# Altium PCB Junction_Box.PcbDoc (part 1 of 2)
Units mm, origin at the board's own origin, x right, y up, seen from the top; angles counter-clockwise.
Board outline 50.93 x 35.69 mm, 2 copper layers (Top Layer, Bottom Layer), stack 1.448 mm thick; 47 components, 35 nets, 148 pads, 173 vias.
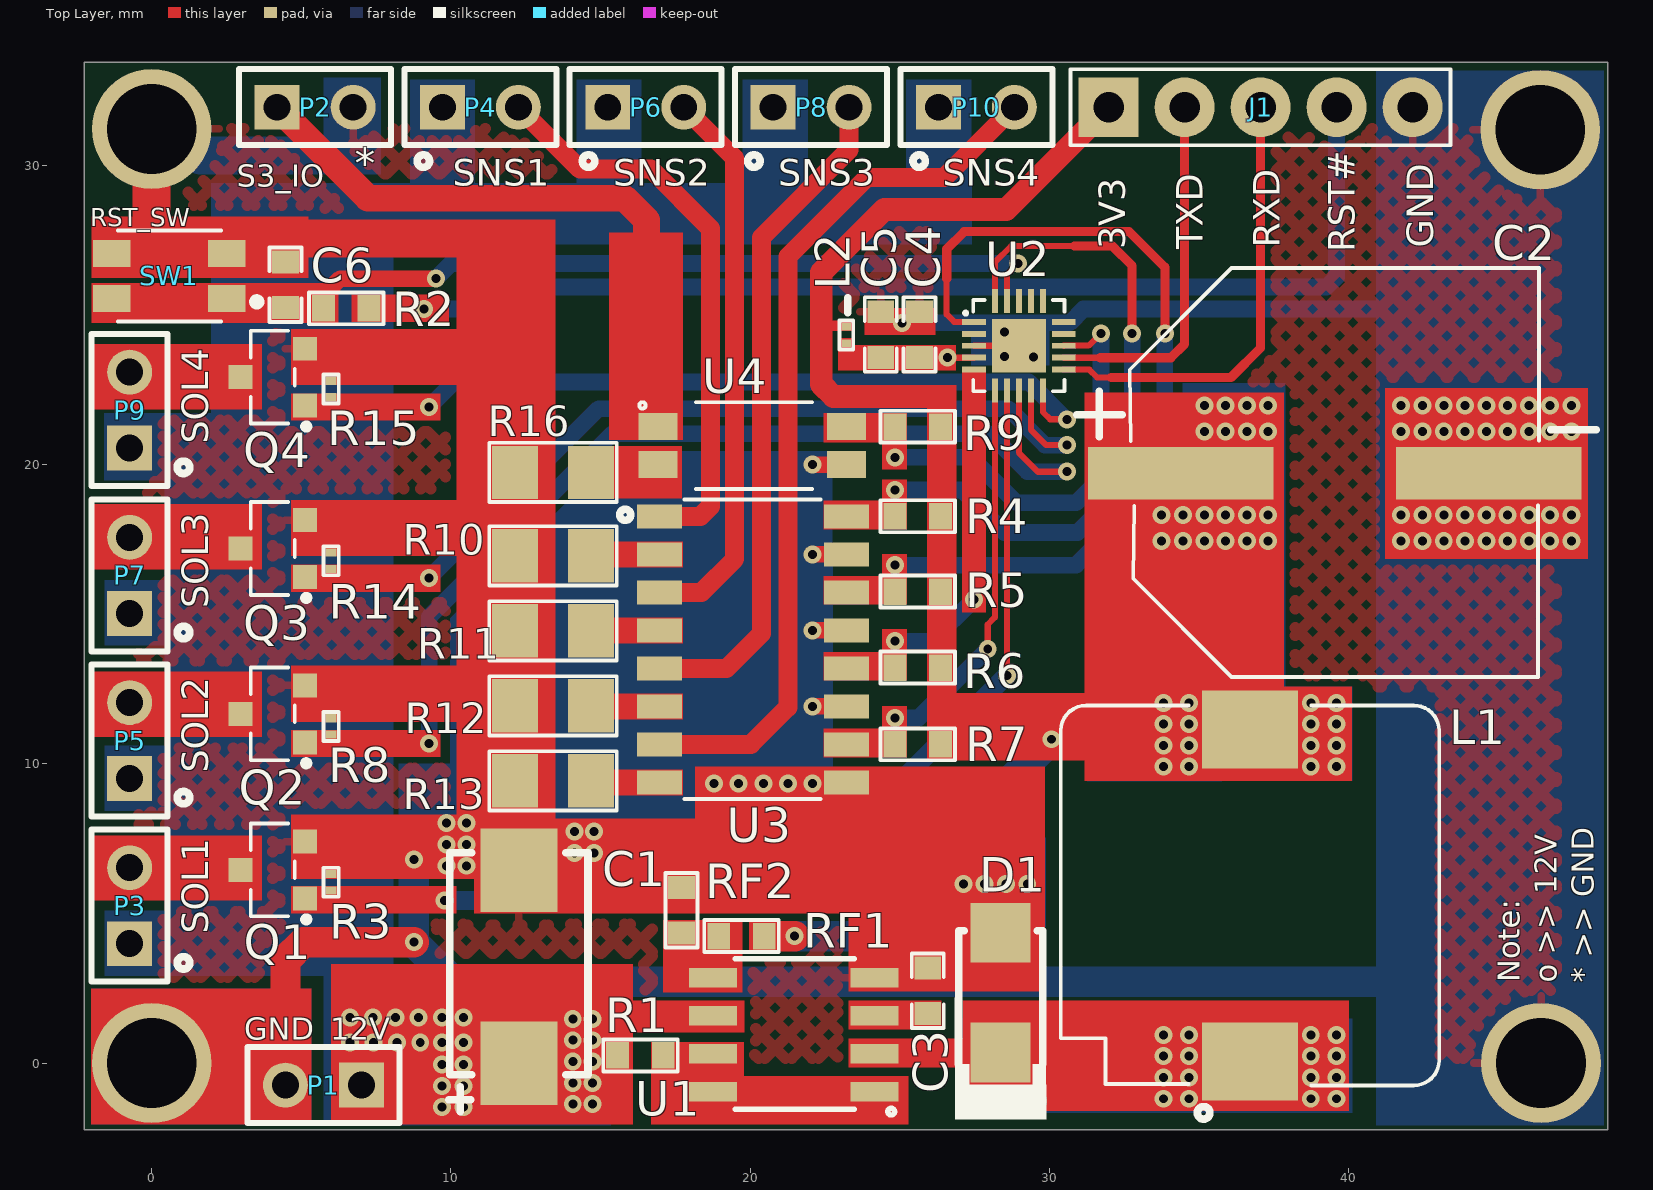
[diagram p0: Top Layer view]
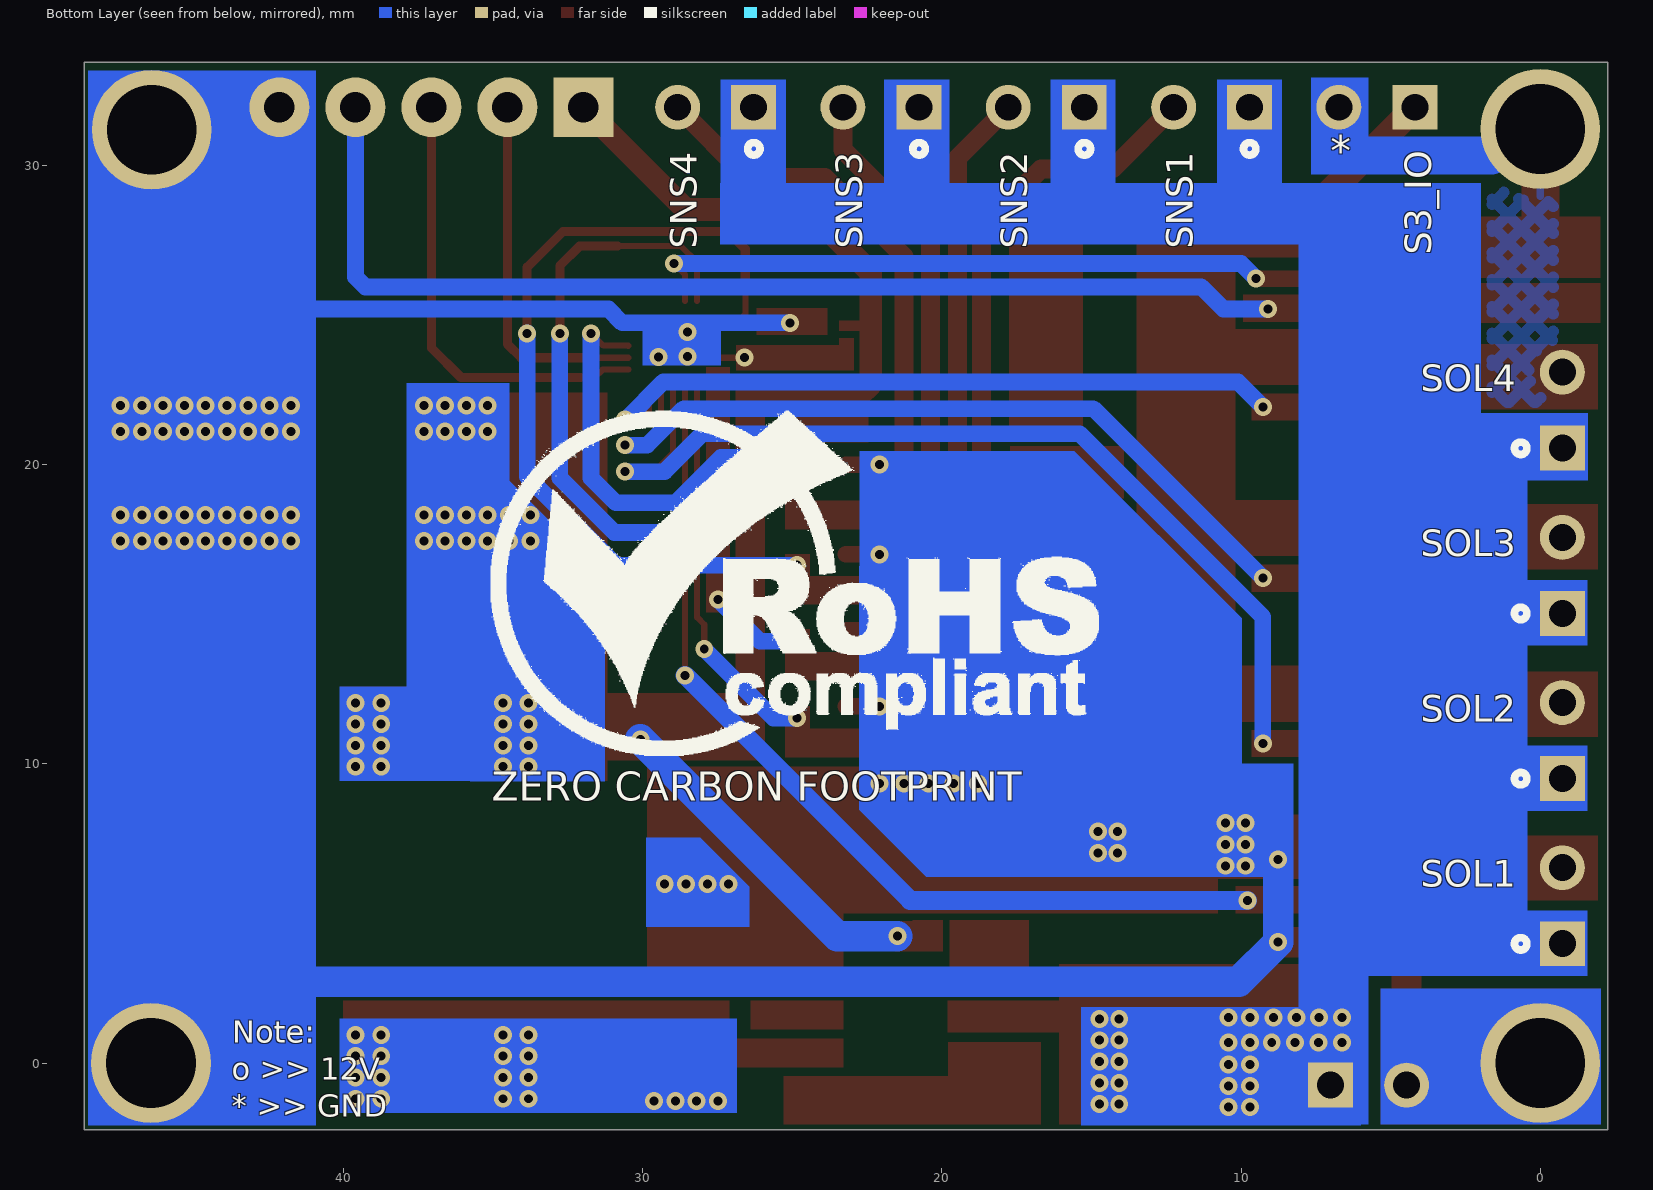
[diagram p1: Bottom Layer view, seen from below]
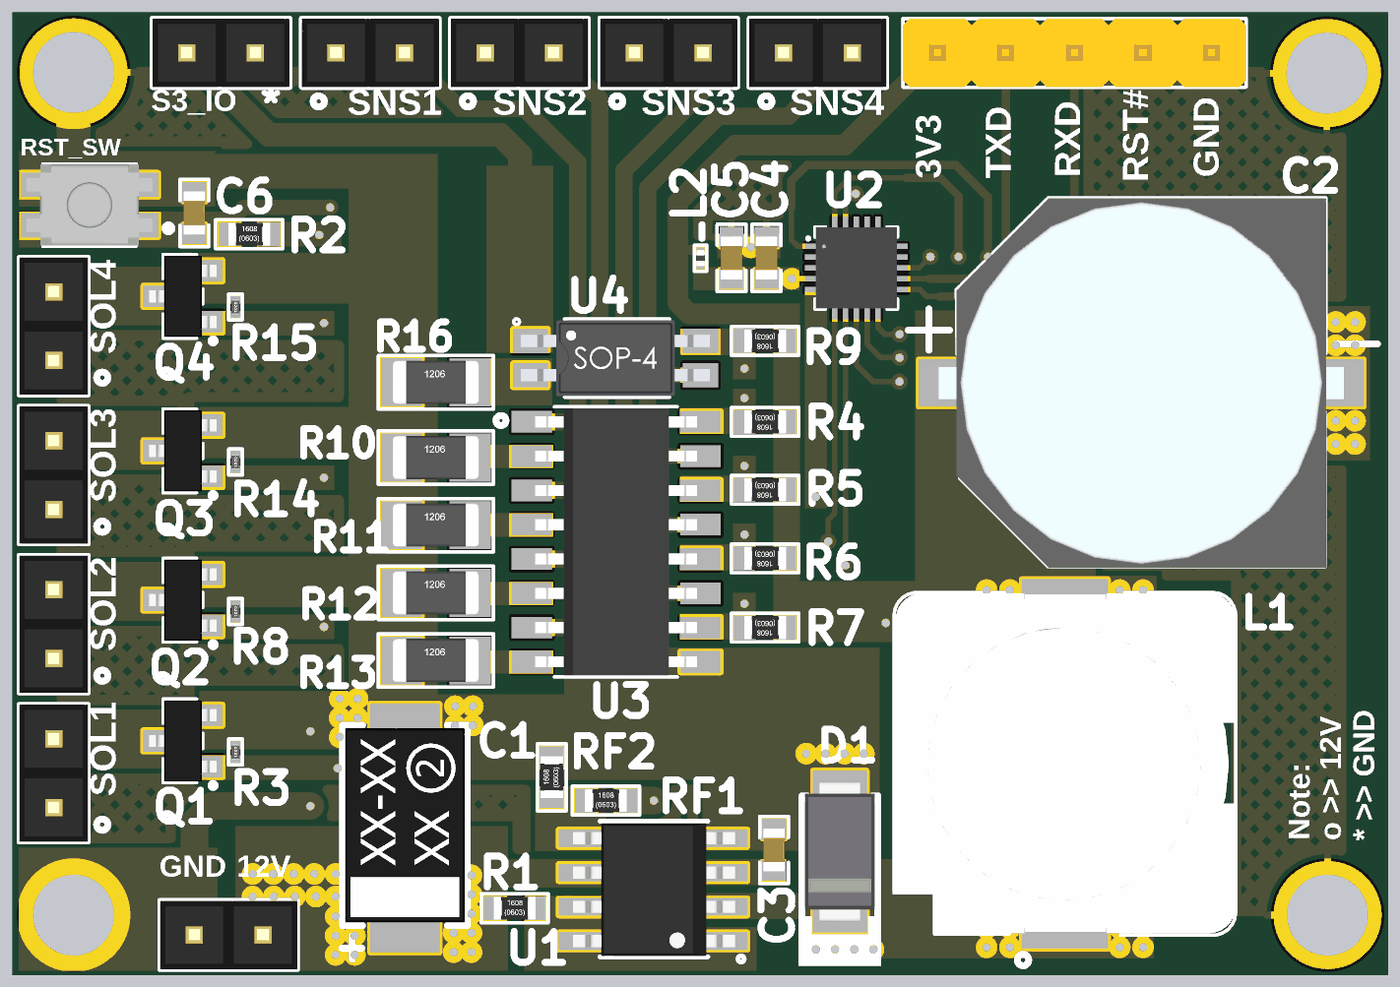
[diagram p2: 3D render of the assembled board from above, using the file's embedded part models]

## Layer stack, top to bottom
Top Solder: solder mask 0.0762, Solder Resist, Dk 3.5
Top Layer: signal copper 0.254
Dielectric 1: dielectric 0.9398, FR-4, Dk 4.8
Bottom Layer: signal copper 0.254
Bottom Solder: solder mask 0.0762, Solder Resist, Dk 3.5

## Board outline
-2.261,-2.235 48.666,-2.235 48.666,33.452 -2.261,33.452

## Design rules (kind name [scope] priority, off if disabled: settings)
Clearance [All] p1: gap=0.178 ignorepadtopadclearanceinfootprint=FALSE except(0: Arc-Hole Track-Hole SMDPad-Hole THPad-Hole Via-Hole Fill-Hole Poly-Hole Region-Hole Text-Hole; 0.102: Arc-SMDPad Track-SMDPad SMDPad-SMDPad)
ComponentClearance [All] p1: gap=0.051 collisioncheckmode=3 verticalgap=0.051 showdistances=FALSE checkcomponentboundary=TRUE
HoleSize [All] p1: absolutevalues=TRUE maxlimit=25.4 minlimit=0.025 maxpercent=80.000 minpercent=20.000
HoleToHoleClearance [All] p1: gap=0 allowstackedmicrovias=TRUE
MinimumSolderMaskSliver [All] p1: minsoldermaskwidth=0
PolygonConnect [All] p1: thpad.connectstyle=Relief thpad.reliefconductorwidth=0.254 thpad.reliefentries=4 thpad.polygonreliefangle="90 Angle" thpad.airgapwidth=0.254 smdpad.connectstyle=Relief smdpad.reliefconductorwidth=0.254 smdpad.reliefentries=4 smdpad.polygonreliefangle="90 Angle" smdpad.airgapwidth=0.254 via.connectstyle=Direct via.reliefconductorwidth=0.254 via.reliefentries=4 via.polygonreliefangle="90 Angle" via.airgapwidth=0.254
RoutingVias [All] p1: holewidth=0.3 width=0.6 viastyle="Through Hole" minholewidth=0.3 minwidth=0.6 maxholewidth=0.3 maxwidth=0.6
SilkToSilkClearance [All] p1: silktosilkclearance=0
SilkToSolderMaskClearance [IsPad] p1: minsilkscreentomaskgap=0 clearancetoexposedcopper=TRUE
SolderMaskExpansion [All] p1: expansion=0.102 istentingtop=FALSE
Width [All] p1: maxlimit=1.27 minlimit=0.203 preferedwidth=0.559 minimp=50.000000 maximp=50.000000 favimp=50.000000
24 further rules are at their usual default settings.

## Classes and differential pairs
component class Power_Section: C1 C2 C3 D1 L1 R1 RF1 RF2 U1
component class Peripheral_Section: Q1 Q2 Q3 Q4 R3 R4 R5 R6 R7 R8 R9 R10 R11 R12 R13 R14 R15 R16 U3 U4
component class Controller_Section: C4 C5 C6 L2 R2 SW1 U2
component class Connector_Section: J1 P1 P2 P3 P4 P5 P6 P7 P8 P9 P10

## Components (designator, comment, footprint, x,y, rotation, side; value= is the part's Value field where it differs from the comment)
C1 "100uF" "CAP- 2917" 12.268,0 r90 top locked
C2 "470uF" VT1H471MI135000CE0 39.534,19.71 r0 top locked
C3 "470pF" Cap0603 25.933,2.413 r270 top locked
C4 "0.1uF" Cap0603 25.658,24.344 r270 top locked
C5 "1uF" Cap0603 24.362,24.344 r270 top locked
C6 "0.1uF" Cap0603 4.47,26.01 r90 top locked
D1 "SS24A" SMA 28.372,2.356 r90 top locked
J1 "PZ254V-11-05P" HDR1X5 37.059,31.942 r0 top locked
L1 "220uH" SLF12575T-221M1R3-PF 36.703,5.601 r90 top locked
L2 "MMZ0603S601CT000" "IND 0201" 23.216,24.333 r270 top
P1 "61300211121" HDR1X2 7.01,-0.737 r180 top locked
P2 "61300211121" HDR1X2 4.191,31.942 r0 top locked
P3 "61300211121" HDR1X2 -0.737,3.988 r90 top locked
P4 "61300211121" HDR1X2 9.716,31.942 r0 top locked
P5 "61300211121" HDR1X2 -0.737,9.508 r90 top locked
P6 "61300211121" HDR1X2 15.24,31.942 r0 top locked
P7 "61300211121" HDR1X2 -0.737,15.028 r90 top locked
P8 "61300211121" HDR1X2 20.764,31.942 r0 top locked
P9 "61300211121" HDR1X2 -0.737,20.549 r90 top locked
P10 "61300211121" HDR1X2 26.289,31.942 r0 top locked
Q1 "DMN13H750S-7" SOT23-3 4.047,6.452 r90 top locked
Q2 "DMN13H750S-7" SOT23-3 4.047,11.669 r90 top locked
Q3 "DMN13H750S-7" SOT23-3 4.047,17.196 r90 top locked
Q4 "DMN13H750S-7" SOT23-3 4.047,22.921 r90 top locked
R1 "0.33R" RES-0603 16.332,0.254 r180 top locked value=0.33Ω
R2 "4.7K" RES-0603 6.502,25.222 r180 top locked
R3 "10K" Res-0201 5.994,6.041 r270 top locked
R4 "3.3K" RES-0603 25.603,18.271 r0 top locked
R5 "3.3K" RES-0603 25.603,15.756 r0 top locked
R6 "3.3K" RES-0603 25.603,13.216 r0 top locked
R7 "3.3K" RES-0603 25.603,10.651 r0 top locked
R8 "10K" Res-0201 5.994,11.248 r270 top locked
R9 "3.3K" RES-0603 25.603,21.268 r0 top locked
R10 "536R" Res-1206 13.411,16.95 r0 top locked
R11 "536R" Res-1206 13.411,14.444 r0 top locked
R12 "536R" Res-1206 13.411,11.938 r0 top locked
R13 "536R" Res-1206 13.411,9.432 r0 top locked
R14 "10K" Res-0201 5.994,16.785 r270 top locked
R15 "10K" Res-0201 5.994,22.525 r270 top locked
R16 "536R" Res-1206 13.411,19.736 r0 top locked
RF1 "2K" RES-0603 19.71,4.242 r180 top locked
RF2 "1.2K" RES-0603 17.704,5.105 r270 top locked value=1.2kΩ
SW1 "TS-1185EC-C-D-B" TS-1185EC-C-D-B 0.59,26.302 r180 top locked
U1 "MC34063ADR" SOIC-8 21.488,0.94 r180 top locked
U2 "ATTINY1616-MNR" 20-QFN 28.98,23.971 r0 top locked
U3 "LTV-247" LTV-247 20.091,13.826 r0 top locked
U4 "PS2801C-1-F3-A" PS2801C-1-F3-A 20.064,20.633 r0 top locked

## Footprints (in the part's own frame and the unit in brackets; to place one, negate y for a bottom-side part, rotate by r counter-clockwise, add the part's x,y. Pads: shape width x height; smd on the part's side, far side on the other; paste and mask are expansions set on the pad)
20-QFN [mm] "IC MCU 8BIT 16KB FLASH 20VQFN"
  rect 0.8x0.2 smd: 1(-1.5,0.8) 2(-1.5,0.4) 3(-1.5,0) 4(-1.5,-0.4) 5(-1.5,-0.8) 11(1.5,-0.8) 12(1.5,-0.4) 13(1.5,0) 14(1.5,0.4) 15(1.5,0.8)
  rect 0.2x0.8 smd: 6(-0.8,-1.5) 7(-0.4,-1.5) 8(0,-1.5) 9(0.4,-1.5) 10(0.8,-1.5) 16(0.8,1.5) 17(0.4,1.5) 18(0,1.5) 19(-0.4,1.5) 20(-0.8,1.5)
  rect 1.8x1.8 smd: 21(0,0)
  silkscreen extent -1.83,-1.52 1.52,1.52, body extent -1.5,-1.5 1.5,1.5, height 0.59
Cap0603 [mil]
  rect 30x35 smd mask+2.36: 1(-30,0) 2(30,0)
  silkscreen extent -49,-21 49,21, body extent -32,-16 31,16, height 34
"CAP- 2917" [mm]
  rect 2.79x2.57 smd: 1(0,0) 2(6.44,0)
  silkscreen extent -1.63,-2.31 7.03,2.34, body extent -0.27,-2.21 6.92,2.21, height 2.88
HDR1X2 [mm] "CONN HEADER VERT 2POS 2.54MM"
  rect 1.5x1.5 hole 0.9: 1(0,0)
  round 1.5 hole 0.9: 2(2.54,0)
  silkscreen extent -1.27,-1.27 3.81,1.27, body extent -1.27,-1.27 3.81,1.27, height 8.44
HDR1X5 [mm] "Through Hole,P=2.54mm"
  rect 2x2 hole 1.02: 1(-5.08,0)
  round 2 hole 1.02: 2(-2.54,0) 3(0,0) 4(2.54,0) 5(5.08,0)
  silkscreen extent -6.35,-1.27 6.35,1.27, body extent -6.35,-1.27 6.35,1.27, height 8.64
"IND 0201" [mm]
  rect 0.25x0.3 smd mask+0.055: 1(-0.275,0) 2(0.275,0)
  silkscreen extent -0.48,-0.23 0.48,0.23, body extent -0.3,-0.15 0.3,0.15, height 0.15
LTV-247 [mm]
  rect 1.5x0.8 smd: 1(-3.125,4.445) 2(-3.125,3.175) 3(-3.125,1.905) 4(-3.125,0.635) 5(-3.125,-0.635) 6(-3.125,-1.905) 7(-3.125,-3.175) 8(-3.125,-4.445) 9(3.125,-4.445) 10(3.125,-3.175) 11(3.125,-1.905) 12(3.125,-0.635) 13(3.125,0.635) 14(3.125,1.905) 15(3.125,3.175) 16(3.125,4.445)
  silkscreen extent -4.45,-5 2.26,5, body extent -3,-4.95 3,4.95, height 1.4
PS2801C-1-F3-A [mm]
  rect 1.3x0.9 smd: 1(-3.15,0.635) 2(-3.15,-0.635) 3(3.15,-0.635) 4(3.15,0.635)
  silkscreen extent -3.77,-1.45 2,1.45, body extent -3.5,-1.4 3.5,1.4, height 2.1
Res-0201 [mm]
  rect 0.27x0.37 smd: 1(-0.275,0) 2(0.275,0)
  silkscreen extent -0.48,-0.25 0.48,0.25, body extent -0.3,-0.15 0.3,0.15, height 0.29
RES-0603 [mil]
  rect 30x35 smd: 1(-30,0) 2(30,0)
  silkscreen extent -49,-21 49,21, body extent -31,-17 31,17, height 18
Res-1206 [mil]
  rect 60x70 smd: 1(-50,0) 2(50,0)
  silkscreen extent -84,-39 84,39, body extent -63,-31 63,32, height 39
SLF12575T-221M1R3-PF [mm]
  rect 2.6x3.2 smd: 1(-5.55,0) 2(5.55,0)
  silkscreen extent -7.48,-6.32 6.35,6.32, body extent -6.27,-6.33 6.33,6.27, height 7.5
SMA [mm]
  rect 2x2 smd: 1(-2,0) 2(2,0)
  silkscreen extent -4.24,-1.52 2.06,1.53, body extent -2.6,-1.3 2.6,1.3, height 2.4
SOIC-8 [mm]
  rect 1.6x0.65 smd: 1(-2.667,1.905) 2(-2.667,0.635) 3(-2.667,-0.635) 4(-2.667,-1.905) 5(2.733,-1.905) 6(2.733,-0.635) 7(2.733,0.635) 8(2.733,1.905)
  silkscreen extent -3.34,-2.54 1.99,2.68, body extent -3,-2.46 3,2.46, height 1.61
SOT23-3 [mm] "SOT23, 3-Leads, Body 2.9x1.3mm, Pitch 0.95mm, Lead Span 2.3mm - Reverse Pinning, IPC High Density"
  rect 0.8x0.8 smd: 1(-0.95,-1.075) 2(0.95,-1.075) 3(0,1.075)
  silkscreen extent -1.73,-1.19 1.55,0.74, body extent -1.5,-1.25 1.5,1.25, height 1.05
TS-1185EC-C-D-B [mm]
  rect 1.25x0.9 smd: 1(-1.925,0.75) 1(1.925,0.75) 2(-1.925,-0.75) 2(1.925,-0.75)
  silkscreen extent -3.05,-1.52 1.73,1.52, body extent -2.33,-1.5 2.32,1.5, height 2
VT1H471MI135000CE0 [mm] "470uF ±20% 50V 12.5mm 13.5mm 1000hrs 105? -40?~+105? SMD,12.5x13.5mm Aluminum Electrolytic Capacitors - SMD RoHS"
  rect 6.2x1.75 smd: 1(-5.145,0) 2(5.145,0)
  silkscreen extent -8.62,-6.81 8.74,6.86, body extent -7.5,-6.85 7.5,6.85, height 14

## Part data
C1: library part TAJE107M025RNJ, "CAP TANT 100UF 20% 25V 2917", Case Code (Imperial)=2917, Case Code (Metric)=7343, ESR (Equivalent Series Resistance)=300mR, Leakage Current=25uA, Manufacturer="Kyocera AVX", Max Operating Temperature=125°C, Min Operating Temperature=-55°C, Package Quantity=1, Supplier Part Number 1=581-TAJE107M025RNJ, Tolerance=20%, Voltage Rating=25V, Capacitance=100uF, Case/Package=2917, Category="Tantalum Capacitors", ComponentLink1Description=https://datasheet.ciiva.com/26787/taje107m025rnj-26787048.pdf?src-supplier=IIIC, ComponentLink1URL=https://datasheet.ciiva.com/26787/taje107m025rnj-26787048.pdf?src-supplier=IIIC, ComponentLink2Description=https://datasheet.ciiva.com/265/taj-265541.pdf?src-supplier=Digi-Key, ComponentLink2URL=https://datasheet.ciiva.com/265/taj-265541.pdf?src-supplier=Digi-Key, ComponentLink3Description=https://datasheet.ciiva.com/265/taj-265542.pdf?src-supplier=Digi-Key, ComponentLink3URL=https://datasheet.ciiva.com/265/taj-265542.pdf?src-supplier=Digi-Key, ComponentLink4Description=https://datasheet.ciiva.com/265/taj-265540.pdf?src-supplier=Digi-Key, ComponentLink4URL=https://datasheet.ciiva.com/265/taj-265540.pdf?src-supplier=Digi-Key, ComponentLink5Description=https://datasheet.ciiva.com/28609/1719052-28609254.pdf?src-supplier=Element14, ComponentLink5URL=https://datasheet.ciiva.com/28609/1719052-28609254.pdf?src-supplier=Element14, ComponentLink6Description=https://datasheet.ciiva.com/11230/taj-11230456.pdf?src-supplier=Avnet, ComponentLink6URL=https://datasheet.ciiva.com/11230/taj-11230456.pdf?src-supplier=Avnet, ComponentLink7Description=https://datasheet.ciiva.com/17339/taj-17339677.pdf?src-supplier=Avnet+Europe, ComponentLink7URL=https://datasheet.ciiva.com/17339/taj-17339677.pdf?src-supplier=Avnet+Europe, ComponentLink8Description=https://datasheet.ciiva.com/22667/1719052-22667581.pdf?src-supplier=Element14, ComponentLink8URL=https://datasheet.ciiva.com/22667/1719052-22667581.pdf?src-supplier=Element14, Construction=Flat, Depth=4.3mm, Dissipation Factor=10%, Features="General Purpose", Height=4.3mm, Height - Seated (Max)=0.169inch, Lead Free="Lead Free", Length=7.3mm, Manufacturer Part Number=TAJE107M025RNJ, Mount="Surface Mount", Number of Pins=2, Packaging="Tape and Reel", Polarity=Polar, Pricing 1="1=2.81000, 10=2.81000, 50=2.81000, 100=2.19000, 1000=1.76000, 10000=1.76000 (USD)", Radiation Hardening=No, REACH SVHC="No SVHC", RoHS=Yes, RoHS Compliant=Yes, Series=TAJ, Stock 1=109, Supplier 1=Mouser, Termination=SMD/SMT, Voltage Rating (DC)=25V, Width=4.3mm
C2: library part VT1H471MI135000CE0, "470uF ±20% 50V 12.5mm 13.5mm 1000hrs 105℃ -40℃~+105℃ SMD,12.5x13.5mm Aluminum Electrolytic Capacitors - SMD RoHS", Lifetime @ Temp="1000hrs 105℃", Manufacturer="Changzhou Huawei Elec", Operating Temperature=-40℃~+105℃, Package=SMD,12.5x13.5mm, Rated Voltage=50V, Tolerance=±20%, Capacitance=470uF, L=13.5mm, φD=12.5mm
C3: library part CC0603KRX7R9BB471, "CAP CER 470pF 10% X7R 50V 0603 SMD", Case Code (Imperial)=0603, Case Code (Metric)=1608, Dielectric=X7R, Dielectric Material=Ceramic, Insulation Resistance=10GR, Manufacturer=Yageo, Max Operating Temperature=125°C, Min Operating Temperature=-55°C, Package Quantity=1, Supplier Part Number 1=311-1078-1-ND, Tolerance=10%, Voltage Rating=50V, Capacitance=470pF, Case/Package=0603, Category="Ceramic Capacitors", ComponentLink1Description=https://datasheet.ciiva.com/5425/upy-gphc-x7r-6-3v-to-50v-8-12304-5425461.pdf?src-supplier=Mouser, ComponentLink1URL=https://datasheet.ciiva.com/5425/upy-gphc-x7r-6-3v-to-50v-8-12304-5425461.pdf?src-supplier=Mouser, ComponentLink2Description=https://datasheet.ciiva.com/144/mlccorderingcode-144439.pdf?src-supplier=Digi-Key, ComponentLink2URL=https://datasheet.ciiva.com/144/mlccorderingcode-144439.pdf?src-supplier=Digi-Key, ComponentLink3Description=https://datasheet.ciiva.com/144/mlccorderingcode-144440.pdf?src-supplier=Digi-Key, ComponentLink3URL=https://datasheet.ciiva.com/144/mlccorderingcode-144440.pdf?src-supplier=Digi-Key, ComponentLink4Description=https://datasheet.ciiva.com/11587/upy-gphc-x7r-6-3v-to-50v-8-11587224.pdf?src-supplier=Avnet, ComponentLink4URL=https://datasheet.ciiva.com/11587/upy-gphc-x7r-6-3v-to-50v-8-11587224.pdf?src-supplier=Avnet, ComponentLink5Description=https://datasheet.ciiva.com/144/mlccorderingcode-144441.pdf?src-supplier=Digi-Key, ComponentLink5URL=https://datasheet.ciiva.com/144/mlccorderingcode-144441.pdf?src-supplier=Digi-Key, ComponentLink6Description=https://datasheet.ciiva.com/16623/upy-gphc-x7r-6-3v-to-50v-8-16623897.pdf?src-supplier=Avnet+Europe, ComponentLink6URL=https://datasheet.ciiva.com/16623/upy-gphc-x7r-6-3v-to-50v-8-16623897.pdf?src-supplier=Avnet+Europe, ComponentLink7Description=https://datasheet.ciiva.com/8033/1489800-8033898.pdf?src-supplier=Element14, ComponentLink7URL=https://datasheet.ciiva.com/8033/1489800-8033898.pdf?src-supplier=Element14, ComponentLink8Description=https://datasheet.ciiva.com/8033/1489800-8033899.pdf?src-supplier=Element14, ComponentLink8URL=https://datasheet.ciiva.com/8033/1489800-8033899.pdf?src-supplier=Element14, ComponentLink9Description=https://datasheet.ciiva.com/26829/getdatasheetpartid-251791-26829452.pdf?src-supplier=Verical, ComponentLink9URL=https://datasheet.ciiva.com/26829/getdatasheetpartid-251791-26829452.pdf?src-supplier=Verical, ComponentLink10Description=https://datasheet.ciiva.com/28450/1489800-28450652.pdf?src-supplier=Element14, ComponentLink10URL=https://datasheet.ciiva.com/28450/1489800-28450652.pdf?src-supplier=Element14, ComponentLink11Description=https://datasheet.ciiva.com/8033/70765-8033902.pdf?src-supplier=Element14, ComponentLink11URL=https://datasheet.ciiva.com/8033/70765-8033902.pdf?src-supplier=Element14, Depth=0.8mm, Dissipation Factor=2.5%, Halogen Free="Halogen Free", Height=0.8mm, Lead Free="Lead Free", Length=1.6mm, Manufacturer Part Number=CC0603KRX7R9BB471, Mount="Surface Mount", Number of Pins=2, Packaging="Tape and Reel", Pricing 1="1=0.10000, 10=0.04500, 50=0.02460, 100=0.02010, 500=0.01432, 1000=0.01125 (USD)", Radiation Hardening=No, REACH SVHC="No SVHC", Resistor Type=Ceramic, RoHS=Yes, RoHS Compliant=Yes, Series=CC, Stock 1=2173, Supplier 1=Digi-Key, Termination=SMD/SMT, Thickness=0.035inch, Voltage Rating (DC)=50V, Width=0.8mm
C4 C6: library part CC0603ZRY5V9BB104, "CAP CER 0.1UF 50V Y5V 0603", Capacitance=100nF, Case Code (Imperial)=0603, Case Code (Metric)=1608, Dielectric=Y5V, Manufacturer=Yageo, Max Operating Temperature=85°C, Min Operating Temperature=-30°C, Package Quantity=1, Supplier Part Number 1=311-1343-1-ND, Tolerance=80%, Voltage=50V, Case/Package=0603, ComponentLink1Description=http://www.yageo.com/documents/recent/UPY-GPHC_Y5V_6.3V-to-50V_8.pdf?src-supplier=Digi-Key, ComponentLink1URL=http://www.yageo.com/documents/recent/UPY-GPHC_Y5V_6.3V-to-50V_8.pdf?src-supplier=Digi-Key, ComponentLink2Description=http://www.yageo.com/documents/recent/UPY-GPHC_Y5V_6.3V-to-50V_5.pdf?src-supplier=Avnet+Europe, ComponentLink2URL=http://www.yageo.com/documents/recent/UPY-GPHC_Y5V_6.3V-to-50V_5.pdf?src-supplier=Avnet+Europe, ComponentLink3Description=https://www.verical.com/server-webapp/html/getDatasheet?partID=403611&src-supplier=Verical, ComponentLink3URL=https://www.verical.com/server-webapp/html/getDatasheet?partID=403611&src-supplier=Verical, ComponentLink4Description=http://www.mouser.com/ds/2/447/Yageo_UPY-GP_NP0_16V-to-50V_9-358835.pdf?src-supplier=Mouser, ComponentLink4URL=http://www.mouser.com/ds/2/447/Yageo_UPY-GP_NP0_16V-to-50V_9-358835.pdf?src-supplier=Mouser, ComponentLink5Description=http://www.farnell.com/datasheets/1132289.pdf?src-supplier=Element14, ComponentLink5URL=http://www.farnell.com/datasheets/1132289.pdf?src-supplier=Element14, Composition=Ceramic, Depth=0.8mm, Halogen Free="Halogen Free", Height=0.8mm, Lead Free="Lead Free", Length=1.6mm, Manufacturer Part Number=CC0603ZRY5V9BB104, Mount="Surface Mount", Number of Pins=2, Packaging="Tape and Reel", Pricing 1="1=0.1, 10=0.075, 100=0.0334, 500=0.02386, 1000=0.01874 (USD)", Radiation Hardening=No, REACH SVHC="No SVHC", Stock 1=15000880, Supplier 1=Digi-Key, Termination=SMD/SMT, Thickness=0.035inch, Voltage Rating=50V, Voltage Rating (DC)=50V, Width=0.031inch
C5: library part CC0603KRX5R8BB105, "CAP CER 1UF 25V X5R 0603", Case Code (Imperial)=0603, Case Code (Metric)=1608, Dielectric=X5R, Manufacturer=Yageo, Max Operating Temperature=85°C, Min Operating Temperature=-55°C, Package Quantity=1, Supplier Part Number 1=311-1445-6-ND, Tolerance=10%, Voltage Rating=25V, Capacitance=1uF, Case/Package=0603, ComponentLink1Description=http://www.yageo.com/documents/recent/UPY-GPHC_X5R_4V-to-50V_25.pdf?src-supplier=Digi-Key, ComponentLink1URL=http://www.yageo.com/documents/recent/UPY-GPHC_X5R_4V-to-50V_25.pdf?src-supplier=Digi-Key, ComponentLink2Description=http://www.yageo.com/documents/recent/UPY-GPHC_X5R_4V-to-50V_12.pdf?src-supplier=Avnet+Europe, ComponentLink2URL=http://www.yageo.com/documents/recent/UPY-GPHC_X5R_4V-to-50V_12.pdf?src-supplier=Avnet+Europe, ComponentLink3Description=http://www.farnell.com/datasheets/1525783.pdf?src-supplier=Element14, ComponentLink3URL=http://www.farnell.com/datasheets/1525783.pdf?src-supplier=Element14, ComponentLink4Description=http://www.yageo.com/documents/recent/UPY-GPHC_X5R_4V-to-50V_12.pdf?src-supplier=Avnet, ComponentLink4URL=http://www.yageo.com/documents/recent/UPY-GPHC_X5R_4V-to-50V_12.pdf?src-supplier=Avnet, Depth=0.8mm, Halogen Free="Halogen Free", Height=0.8mm, Lead Free="Lead Free", Length=1.6mm, Manufacturer Part Number=CC0603KRX5R8BB105, Mount="Surface Mount", Number of Pins=2, Packaging="Tape and Reel", Pricing 1="1=0.1, 10=0.069, 100=0.0307, 500=0.0219, 1000=0.0172 (USD)", Radiation Hardening=No, REACH SVHC="No SVHC", Stock 1=1419041, Supplier 1=Digi-Key, Termination=SMD/SMT, Thickness=0.035inch, Voltage Rating (DC)=25V, Width=0.031inch
D1: "40V 500mV@2A 2A SMA(DO-214AC) Schottky Barrier Diodes (SBD) ROHS", Manufacturer=Yangzhou, Package=SMA(DO-214AC), Manufacturer Part No=SS24A
J1: "Pin Header 5 1 right-angle", Manufacturer=XFCN, Brand Category="Made In Asia Brands", Connector Type="Pin Header", Number of Pins=5, Number of Rows=1, Packaging=Bag-packed, Pitch=2.54
L1: library part SLF12575T-221M1R3-PF, "Inductor Power Shielded Wirewound 220uH 20% 1KHz Ferrite 1.3A 310mOhm DCR Blister T/R", Case/Package=Nonstandard, Current Rating=1.3A, DC Resistance (DCR)=310mR, Manufacturer=TDK, Max Operating Temperature=105°C, Min Operating Temperature=-20°C, Package Quantity=500, Resistor Type=Wirewound, Supplier Part Number 1=445-174412-1-ND, Test Frequency=1kHz, Tolerance=20%, Category="Fixed Inductors", ComponentLink1Description=https://datasheet.ciiva.com/11802/0900766b812b7d4f-11802208.pdf?src-supplier=RSComponents, ComponentLink1URL=https://datasheet.ciiva.com/11802/0900766b812b7d4f-11802208.pdf?src-supplier=RSComponents, Core Material=Ferrite, DC Current=1.3A, Depth=12.8mm, Height=0.295inch, Height - Seated (Max)=0.309inch, Inductance=220uH, Lead Free="Lead Free", Length=12.5mm, Manufacturer Part Number=SLF12575T-221M1R3-PF, Max DC Current=1.3A, Military Standard=Not, Mount="Surface Mount", Packaging="Tape and Reel", Pricing 1="1=1.97000, 10=1.81500, 25=1.66360, 50=1.42180, 100=1.27050, 250=1.08900 (USD)", RoHS=Yes, RoHS Compliant=Yes, Saturation Current=1.3A, Series=SLF, Shielding=Shielded, Stock 1=1079, Supplier 1=Digi-Key, Termination=SMD/SMT, Width=12.5mm
L2: "FERRITE BEAD 600 OHM 0201 1LN", Case Code (Imperial)=0201, Case Code (Metric)=0603, Current Rating=100mA, DC Resistance (DCR)=1.45R, Manufacturer=TDK, Package Quantity=15000, Supplier Part Number 1=445-2146-1-ND, Tolerance=25%, Case/Package=0201, Category=Inductors, ComponentLink1Description=https://datasheet.ciiva.com/46381/1795294-46381669.pdf?src-supplier=Element14, ComponentLink1URL=https://datasheet.ciiva.com/46381/1795294-46381669.pdf?src-supplier=Element14, ComponentLink2Description=https://datasheet.ciiva.com/46634/beads-commercial-signal-mmz-en-46634390.pdf?src-supplier=Digi-Key, ComponentLink2URL=https://datasheet.ciiva.com/46634/beads-commercial-signal-mmz-en-46634390.pdf?src-supplier=Digi-Key, ComponentLink3Description=https://datasheet.ciiva.com/48682/beads-commercial-signal-mmz-en-48682603.pdf?src-supplier=Avnet, ComponentLink3URL=https://datasheet.ciiva.com/48682/beads-commercial-signal-mmz-en-48682603.pdf?src-supplier=Avnet, ComponentLink4Description=https://datasheet.ciiva.com/46634/beads-commercial-signal-mmz-en-46634381.pdf?src-supplier=Digi-Key, ComponentLink4URL=https://datasheet.ciiva.com/46634/beads-commercial-signal-mmz-en-46634381.pdf?src-supplier=Digi-Key, Core Material=Ferrite, Height=0.013inch, Impedance=600R, Lead Free="Lead Free", Length=0.024inch, Manufacturer Part Number=MMZ0603S601CT000, Max DC Current=100mA, Mount="Surface Mount", Packaging="Cut Tape", Pricing 1="1=0.12000, 10=0.09900, 25=0.07680, 50=0.06380, 100=0.05500, 250=0.04400, 500=0.03960, 1000=0.03300, 5000=0.03080 (USD)", REACH SVHC="No SVHC", RoHS=Yes, RoHS Compliant=Yes, Stock 1=1540, Supplier 1=Digi-Key, Width=0.012inch
P1 P2 P3 P4 P5 P6 P7 P8 P9 P10: library part "Header 1x2", "CONN HEADER VERT 2POS 2.54MM", Color=Black, Current Rating=3A, Manufacturer="Wurth Electronics", Max Operating Temperature=125°C, Min Operating Temperature=-40°C, Supplier Part Number 1=732-5315-ND, Voltage Rating=250V, ComponentLink1Description=http://www.mouser.com/ds/2/445/6130xx11121-538006.pdf?src-supplier=Mouser, ComponentLink1URL=http://www.mouser.com/ds/2/445/6130xx11121-538006.pdf?src-supplier=Mouser, Connector Type="Male Pin", Contact Gender=Male, Contact Material="Copper Alloy,Copper", Contact Mating Length=0.236inch, Contact Plating=Gold, Gender=Male, Housing Material=PBT, Lead Free="Lead Free", Manufacturer Part Number=61300211121, Mount="Through Hole", Number of Contacts=2, Number of Positions=2, Number of Rows=1, Packaging=Bulk, Pitch=0.1inch, Pricing 1="1=0.13, 10=0.106, 25=0.088, 50=0.074, 100=0.067, 1000=0.061 (USD)", REACH SVHC=Unknown, Stock 1=219205, Supplier 1=Digi-Key, Termination="Through Hole"
Q1 Q2 Q3 Q4: "MOSFET N-CH 130V 1A SOT23", Case/Package=TO-236-3, Continuous Drain Current (ID)=1A, Drain to Source Voltage (Vdss)=130V, Input Capacitance=231pF, Manufacturer=Diodes, Max Operating Temperature=150°C, Max Power Dissipation=770mW, Min Operating Temperature=-55°C, Supplier Part Number 1=DMN13H750S-7DICT-ND, ComponentLink1Description=https://www.diodes.com/assets/Datasheets/DMN13H750S.pdf?src-supplier=Digi-Key, ComponentLink1URL=https://www.diodes.com/assets/Datasheets/DMN13H750S.pdf?src-supplier=Digi-Key, ComponentLink2Description=http://www.mouser.com/ds/2/115/DMN13H750S-526254.pdf?src-supplier=Mouser, ComponentLink2URL=http://www.mouser.com/ds/2/115/DMN13H750S-526254.pdf?src-supplier=Mouser, Manufacturer Part Number=DMN13H750S-7, Mount="Surface Mount", Packaging="Tape and Reel", Pricing 1="1=0.53, 10=0.455, 25=0.4244, 100=0.3151, 250=0.29936, 500=0.24604, 1000=0.19998 (USD)", Rds On Max=750mR, Stock 1=5815, Supplier 1=Digi-Key
R1: library part RTT03R330FTP, "0.33Ω 0603 Chip Resistor - Surface Mount ROHS", Manufacturer=RALEC, Package=0603, Manufacturer Part No=RTT03R330FTP
R2: library part RC0603FR-074K7L, "RES SMD 4.7K OHM 1% 1/10W 0603", Case Code (Imperial)=0603, Case Code (Metric)=1608, Manufacturer=Yageo, Max Operating Temperature=155°C, Max Power Dissipation=100mW, Min Operating Temperature=-55°C, Resistance=4.7kR, Resistance Tolerance=1%, Resistor Type="Thick Film", Supplier Part Number 1=311-4.70KHRCT-ND, Temperature Coefficient=100ppm/°C, Voltage Rating=50V, Case/Package=0603, Category="Chip SMD Resistors", ComponentLink1Description=https://datasheet.ciiva.com/15189/getdatasheetpartid-422754-15189760.pdf?src-supplier=Verical, ComponentLink1URL=https://datasheet.ciiva.com/15189/getdatasheetpartid-422754-15189760.pdf?src-supplier=Verical, ComponentLink2Description=https://datasheet.ciiva.com/22747/443971-22747528.pdf?src-supplier=Element14, ComponentLink2URL=https://datasheet.ciiva.com/22747/443971-22747528.pdf?src-supplier=Element14, ComponentLink3Description=https://datasheet.ciiva.com/7660/38590-7660794.pdf?src-supplier=Element14, ComponentLink3URL=https://datasheet.ciiva.com/7660/38590-7660794.pdf?src-supplier=Element14, ComponentLink4Description=https://datasheet.ciiva.com/7746/1868787-7746365.pdf?src-supplier=Element14, ComponentLink4URL=https://datasheet.ciiva.com/7746/1868787-7746365.pdf?src-supplier=Element14, ComponentLink5Description=https://datasheet.ciiva.com/46440/1868787-46440909.pdf?src-supplier=Element14, ComponentLink5URL=https://datasheet.ciiva.com/46440/1868787-46440909.pdf?src-supplier=Element14, ComponentLink6Description=https://datasheet.ciiva.com/7746/1738695-7746366.pdf?src-supplier=Element14, ComponentLink6URL=https://datasheet.ciiva.com/7746/1738695-7746366.pdf?src-supplier=Element14, Construction=Rectangular, Depth=0.8mm, Features="Moisture Resistant", Height=0.45mm, Lead Free="Lead Free", Lead Pitch=0.3mm, Length=1.6mm, Manufacturer Part Number=RC0603FR-074K7L, Military Standard=Not, Number of Pins=2, Number of Terminations=2, Packaging="Tape and Reel", Power Rating=100mW, Pricing 1="1=0.10000, 10=0.02400, 100=0.00970, 1000=0.00436, 2500=0.00378 (USD)", REACH SVHC="No SVHC", RoHS=Yes, RoHS Compliant=Yes, Series=RC, Size Code=0603, Stock 1=1924316, Supplier 1=Digi-Key, Termination=SMD/SMT, Tolerance=1%, Voltage Rating (DC)=50V, Width=0.8mm
R3 R8 R14 R15: library part RC0201FR-0710KL, "RES SMD 10K OHM 1% 1/20W 0201", Case Code (Imperial)=0201, Case Code (Metric)=0603, Manufacturer=Yageo, Max Operating Temperature=125°C, Max Power Dissipation=50mW, Min Operating Temperature=-55°C, Package Quantity=1, Resistance=10kR, Supplier Part Number 1=311-10.0KMCT-ND, Temperature Coefficient=200ppm/°C, Tolerance=1%, Voltage Rating=25V, Case/Package=0201, ComponentLink1Description=http://www.yageo.com/documents/recent/PYu-RC_Group_51_RoHS_L_10.pdf?src-supplier=Digi-Key, ComponentLink1URL=http://www.yageo.com/documents/recent/PYu-RC_Group_51_RoHS_L_10.pdf?src-supplier=Digi-Key, ComponentLink2Description=http://www.farnell.com/datasheets/2167052.pdf?src-supplier=Element14, ComponentLink2URL=http://www.farnell.com/datasheets/2167052.pdf?src-supplier=Element14, ComponentLink3Description=http://www.yageo.com/documents/recent/PYu-RC0201_51_RoHS_L_8.pdf?src-supplier=Avnet, ComponentLink3URL=http://www.yageo.com/documents/recent/PYu-RC0201_51_RoHS_L_8.pdf?src-supplier=Avnet, ComponentLink4Description=http://www.yageo.com/documents/recent/PYu-RC0201_51_RoHS_L_8.pdf?src-supplier=Avnet+Europe, ComponentLink4URL=http://www.yageo.com/documents/recent/PYu-RC0201_51_RoHS_L_8.pdf?src-supplier=Avnet+Europe, ComponentLink5Description=https://www.verical.com/server-webapp/html/getDatasheet?partID=421074&src-supplier=Verical, ComponentLink5URL=https://www.verical.com/server-webapp/html/getDatasheet?partID=421074&src-supplier=Verical, ComponentLink6Description=http://www.farnell.com/datasheets/1421516.pdf?src-supplier=Element14, ComponentLink6URL=http://www.farnell.com/datasheets/1421516.pdf?src-supplier=Element14, Composition="Thick Film", Contact Plating=Tin,Matte, Depth=0.3mm, Features="Moisture Resistant", Height=0.01inch, Lead Free="Lead Free", Length=0.6mm, Manufacturer Part Number=RC0201FR-0710KL, Military Standard=Not, Number of Pins=2, Number of Terminations=2, Packaging="Tape and Reel", Power Rating=50mW, Pricing 1="1=0.1, 10=0.042, 100=0.0171, 1000=0.00768, 2500=0.00666, 5000=0.00551 (USD)", Radiation Hardening=No, REACH SVHC="No SVHC", Stock 1=12729696, Supplier 1=Digi-Key, Termination=SMD/SMT, Voltage Rating (DC)=25V, Weight=6E-06oz, Width=0.3mm, Working Voltage=25V
R4 R5 R6 R7 R9: library part RC0603FR-073K3L, "RES SMD 3.3K OHM 1% 1/10W 0603", Case/Package=0603, Manufacturer="Yageo Phycomp", Max Operating Temperature=155°C, Min Operating Temperature=-55°C, Power Rating=100mW, Resistance=3.3kR, Supplier Part Number 1=311-3.30KHRCT-ND, Temperature Coefficient=100ppm/°C, Tolerance=1%, Voltage Rating (DC)=50V, Depth=0.8mm, Height=0.45mm, Lead Free="Lead Free", Length=1.6mm, Manufacturer Part Number=RC0603FR-073K3L, Mount="Surface Mount", Number of Pins=2, Packaging="Cut Tape", Pricing 1="1=0.1, 10=0.024, 100=0.0097, 1000=0.00437, 2500=0.00379 (USD)", REACH SVHC="No SVHC", Stock 1=6863000, Supplier 1=Digi-Key, Width=800um
R10 R11 R12 R13: library part AC1206FR-07536RL, "Chip Resistor Automotive Grade Thick Film 1206 536Ohm 1% Paper T/R", Case/Package=1206, Manufacturer=Yageo, Max Operating Temperature=155°C, Max Power Dissipation=250mW, Min Operating Temperature=-55°C, Resistor Type="Thick Film", Temperature Coefficient=100ppm/°C, Tolerance=1%, Category="Chip SMD Resistors", ComponentLink1Description=http://www.yageo.com/NewPortal/yageodocoutput?fileName=/pdf/R-Chip/PYu-AC_51_RoHS_L_6.pdf&src-supplier=Digi-Key, ComponentLink1URL=http://www.yageo.com/NewPortal/yageodocoutput?fileName=/pdf/R-Chip/PYu-AC_51_RoHS_L_6.pdf&src-supplier=Digi-Key, Features="Moisture Resistant,Automotive AEC-Q200", Height=0.026inch, Length=0.122inch, Manufacturer Part Number=AC1206FR-07536RL, Number of Terminations=2, Packaging="Tape and Reel", Pricing 1="5000=0.00554, 10000=0.00547, 20000=0.00531 (USD)", Resistance=536R, RoHS=Yes, RoHS Compliant=Yes, Supplier 1=Avnet, Supplier Part Number 1=AC1206FR-07536RL, Width=0.063inch
R16: library part AC1206FR-07536RL, "RES SMD 1206 536Ohm 1% Paper T/R", Case/Package=1206, Manufacturer=Yageo, Max Operating Temperature=155°C, Max Power Dissipation=250mW, Min Operating Temperature=-55°C, Resistor Type="Thick Film", Temperature Coefficient=100ppm/°C, Tolerance=1%, Category="Chip SMD Resistors", ComponentLink1Description=http://www.yageo.com/NewPortal/yageodocoutput?fileName=/pdf/R-Chip/PYu-AC_51_RoHS_L_6.pdf&src-supplier=Digi-Key, ComponentLink1URL=http://www.yageo.com/NewPortal/yageodocoutput?fileName=/pdf/R-Chip/PYu-AC_51_RoHS_L_6.pdf&src-supplier=Digi-Key, Features="Moisture Resistant,Automotive AEC-Q200", Height=0.026inch, Length=0.122inch, Manufacturer Part Number=AC1206FR-07536RL, Number of Terminations=2, Packaging="Tape and Reel", Pricing 1="5000=0.00554, 10000=0.00547, 20000=0.00531 (USD)", Resistance=536R, RoHS=Yes, RoHS Compliant=Yes, Supplier 1=Avnet, Supplier Part Number 1=AC1206FR-07536RL, Width=0.063inch
RF1: library part RC0603FR-072KL, "RES SMD 2K OHM 1% 1/10W 0603", Case Code (Imperial)=0603, Case Code (Metric)=1608, Manufacturer=Yageo, Max Operating Temperature=155°C, Max Power Dissipation=100mW, Min Operating Temperature=-55°C, Package Quantity=1, Resistance=2kR, Supplier Part Number 1=311-2.00KHRCT-ND, Temperature Coefficient=100ppm/°C, Tolerance=1%, Voltage Rating=50V, Working Voltage=75V, Case/Package=0603, ComponentLink1Description=http://www.farnell.com/datasheets/2167052.pdf?src-supplier=Element14, ComponentLink1URL=http://www.farnell.com/datasheets/2167052.pdf?src-supplier=Element14, ComponentLink2Description=http://documents.rs-components.com/techlib://itc_doclist_GB.htm?stockno=5050139&src-supplier=RSComponents, ComponentLink2URL=http://documents.rs-components.com/techlib://itc_doclist_GB.htm?stockno=5050139&src-supplier=RSComponents, ComponentLink3Description=http://www.yageo.com/documents/recent/PYu-RC_Group_51_RoHS_L_10.pdf?src-supplier=Digi-Key, ComponentLink3URL=http://www.yageo.com/documents/recent/PYu-RC_Group_51_RoHS_L_10.pdf?src-supplier=Digi-Key, ComponentLink4Description=http://www.mouser.com/catalog/specsheets/RC0603.pdf?src-supplier=Mouser, ComponentLink4URL=http://www.mouser.com/catalog/specsheets/RC0603.pdf?src-supplier=Mouser, Composition="Thick Film", Depth=0.8mm, Features="Moisture Resistant", Height=0.45mm, Lead Free="Lead Free", Length=1.6mm, Manufacturer Part Number=RC0603FR-072KL, Military Standard=Not, Number of Pins=2, Number of Terminations=2, Packaging="Tape and Reel", Power Rating=100mW, Pricing 1="1=0.1, 10=0.023, 100=0.0094, 1000=0.00421, 2500=0.00366 (USD)", REACH SVHC="No SVHC", Stock 1=8782961, Supplier 1=Digi-Key, Termination=SMD/SMT, Voltage Rating (DC)=50V, Width=0.031inch
RF2: library part 0603WAF1201T5E, "±1% 1/10W Thick Film Resistors 75V ±100ppm/℃ -55℃~+155℃ 1.2kΩ 0603 Chip Resistor - Surface Mount ROHS", Manufacturer=UNI-ROYAL, Package=0603, Manufacturer Part No=0603WAF1201T5E
SW1: "3mm 2mm Round Button 50mA Top3.65mm SPST 12V SMD Tactile Switches", Manufacturer=XKB, Package=Custom, ComponentLink1Description=LCSC, ComponentLink1URL=https://lcsc.com/product-detail/Tactile-Switches_XKB-Connectivity-TS-1185EC-C-D-B_C318893.html, Manufacturer Part No=TS-1185EC-C-D-B
U1: "1.5-A boost, buck, inverting switching regulator, operation from 0°C to 70°C 8-SOIC 0 to 70", Case/Package=D, Manufacturer="Texas Instruments", Max Input Voltage=40V, Max Operating Temperature=70°C, Max Output Current=750mA, Min Input Voltage=3V, Min Operating Temperature=0°C, Min Output Voltage=1.55V, Output Current=1.5A, Package Quantity=1, Quiescent Current=4mA, Supplier Part Number 1=296-17765-1-ND, Switching Frequency=100kHz, Category="Power Supply Modules", ComponentLink1Description=https://datasheet.ciiva.com/7408/1862376-7408060.pdf?src-supplier=Newark, ComponentLink1URL=https://datasheet.ciiva.com/7408/1862376-7408060.pdf?src-supplier=Newark, ComponentLink2Description=https://datasheet.ciiva.com/2025/mc33063a-2025162.pdf?src-supplier=Digi-Key, ComponentLink2URL=https://datasheet.ciiva.com/2025/mc33063a-2025162.pdf?src-supplier=Digi-Key, ComponentLink3Description=https://datasheet.ciiva.com/2025/mc33063a-2025161.pdf?src-supplier=Digi-Key, ComponentLink3URL=https://datasheet.ciiva.com/2025/mc33063a-2025161.pdf?src-supplier=Digi-Key, ComponentLink4Description=https://datasheet.ciiva.com/2025/mc33063a-2025163.pdf?src-supplier=Digi-Key, ComponentLink4URL=https://datasheet.ciiva.com/2025/mc33063a-2025163.pdf?src-supplier=Digi-Key, Contact Plating=Gold, Lead Free="Lead Free", Manufacturer Part Number=MC34063ADR, Max Output Voltage=40V, Number of Outputs=1, Number of Pins=8, Output Type=Adjustable, Output Voltage=40V, Packaging="Tape and Reel", Pricing 1="1=0.78000, 10=0.68400, 25=0.64240, 100=0.52420, 250=0.48688, 500=0.41438, 1000=0.34206 (USD)", Radiation Hardening=No, REACH SVHC="No SVHC", RoHS=Yes, RoHS Compliant=Yes, Stock 1=17204, Supplier 1=Digi-Key, Synchronous Rectifier=No, Termination=SMD/SMT, Topology=Flyback,SEPIC, Weight=0.002561oz
U2: "IC MCU 8BIT 16KB FLASH 20VQFN", Case/Package=VQFN, Frequency=20MHz, Manufacturer=Microchip, Max Operating Temperature=105°C, Min Operating Temperature=-40°C, Supplier Part Number 1=ATTINY1616-MNRCT-ND, Category=Microcontrollers, ComponentLink1Description=http://www.microchip.com/mymicrochip/filehandler.aspx?ddocname=en606269&src-supplier=Digi-Key, ComponentLink1URL=http://www.microchip.com/mymicrochip/filehandler.aspx?ddocname=en606269&src-supplier=Digi-Key, Core Architecture=AVR, Interface=I2C,SPI,IrDA,UART,USART, Manufacturer Part Number=ATTINY1616-MNR, Memory Size=16KB, Memory Type=FLASH, Number of I/Os=18, Oscillator Type=Internal, Packaging="Cut Tape", Peripherals="Brown-out Detect/Reset,POR,PWM,WDT", Pricing 1="1=0.75000, 25=0.69000, 100=0.62000 (USD)", RoHS=No, Stock 1=3963, Supplier 1=Digi-Key
U3: "OPTOISO 3.75KV 4CH TRANS 16SO", Case/Package=SMD/SMT, Collector Emitter Saturation Voltage=400mV, Collector Emitter Voltage (VCEO)=80V, Current Transfer Ratio=600%, Forward Current=20mA, Forward Voltage=1.2V, Manufacturer="Vishay Lite-On", Max Collector Current=50mA, Max Operating Temperature=110°C, Max Power Dissipation=200mW, Min Operating Temperature=-55°C, Package Quantity=2000, Power Dissipation=170mW, Reverse Breakdown Voltage=6V, Supplier Part Number 1=3051235, Category=Optocouplers, ComponentLink1Description=https://datasheet.ciiva.com/24015/ltv-247-256860-24015561.pdf?src-supplier=Mouser, ComponentLink1URL=https://datasheet.ciiva.com/24015/ltv-247-256860-24015561.pdf?src-supplier=Mouser, ComponentLink2Description=https://datasheet.ciiva.com/29730/ltv-214-244-29730320.pdf?src-supplier=Digi-Key, ComponentLink2URL=https://datasheet.ciiva.com/29730/ltv-214-244-29730320.pdf?src-supplier=Digi-Key, Manufacturer Part Number=LTV-247, Max Input Current=50mA, Max Output Voltage=80V, Mount="Surface Mount", Number of Channels=4, Number of Elements=4, Number of Pins=16, Output Current per Channel=50mA, Packaging="Tape and Reel", Pricing 1="2000=0.77000 (USD)", Radiation Hardening=No, RoHS=Yes, RoHS Compliant=Yes, Stock 1=178000, Supplier 1="Future Electronics"
U4: "TransistorOptocouplers DC 1 2500Vrms SOP-4_P1.27 Optocouplers RoHS", Case/Package=SOIC, Collector Emitter Saturation Voltage=300mV, Forward Voltage=1.2V, Manufacturer=CEL, Max Collector Current=30mA, Max Operating Temperature=100°C, Max Output Voltage=80V, Max Power Dissipation=120mW, Min Operating Temperature=-55°C, Package Quantity=1, Supplier Part Number 1=PS2801C-1-F3-ACT-ND, Collector Emitter Voltage (VCEO)=300mV, ComponentLink1Description=http://www.cel.com/pdf/datasheets/PS2801C-1,PS2801C-4.pdf?src-supplier=Digi-Key, ComponentLink1URL=http://www.cel.com/pdf/datasheets/PS2801C-1,PS2801C-4.pdf?src-supplier=Digi-Key, ComponentLink2Description=http://www.cel.com/pdf/datasheets/how_to_order_optos.pdf?src-supplier=Digi-Key, ComponentLink2URL=http://www.cel.com/pdf/datasheets/how_to_order_optos.pdf?src-supplier=Digi-Key, ComponentLink3Description=http://datasheet.iiic.cc/cel/PS2801C-1-F3-A.pdf?src-supplier=IIIC, ComponentLink3URL=http://datasheet.iiic.cc/cel/PS2801C-1-F3-A.pdf?src-supplier=IIIC, Lead Free="Lead Free", Manufacturer Part Number=PS2801C-1-F3-A, Mount="Surface Mount", Number of Channels=1, Number of Pins=4, Output Current per Channel=30mA, Packaging="Tape and Reel", Pricing 1="1=0.77, 10=0.595, 100=0.3825 (USD)", Stock 1=399, Supplier 1=Digi-Key

## Free pads (board coordinates)
  round 4 hole 3: MH1(0,31.217) MH2(46.406,31.191) MH3(46.431,0) MH4(0,0)

## Via types
v1: diameter 0.6, hole 0.3, Top Layer to Bottom Layer, 136 vias
v2: diameter 0.6, hole 0.3, Top Layer to Bottom Layer, tented both sides, 37 vias

## Nets (pads, with @x,y where several pads share a name; then routed paths per layer and width w, separated by ;. In a path a pad name is that pad's centre, name@x,y a point inside that pad or via, vN(x,y) a via of type N, cw(c..) or ccw(c..) an arc to the next point about the centre after c; other vN are vias at no path point)
3V3: C2.1 J1.1 L1.2 L2.1 R4.2 R5.2 R6.2 R7.2 R9.2 RF1.1 | length 32.4
  Top Layer w0.762: 26.492,21.92 26.137,22.276 22.784,22.276 22.377,22.682 22.377,26.416 24.486,28.524 28.561,28.524 J1.1
  Top Layer w1.016: RF1.1 v2(21.488,4.242)
  Bottom Layer w1.016: v2(21.488,4.242) 23.495,4.242 v2(30.074,10.82)
  other v1: 33.807,9.906 34.671,9.906 38.735,9.906 39.599,9.906 33.807,10.617 34.671,10.617 38.735,10.617 39.599,10.617 33.807,11.328 34.671,11.328 38.735,11.328 39.599,11.328 33.807,12.04 34.671,12.04 38.735,12.04 39.599,12.04 33.754,17.45 34.465,17.45 35.176,17.45 35.887,17.45 36.599,17.45 37.31,17.45 33.754,18.313 34.465,18.313 35.176,18.313 35.887,18.313 36.599,18.313 37.31,18.313 35.176,21.107 35.887,21.107 36.599,21.107 37.31,21.107 35.176,21.971 35.887,21.971 36.599,21.971 37.31,21.971
12V: C1.1 P1.1 P3.1 P4.1 P5.1 P6.1 P7.1 P8.1 P9.1 P10.1 R1.2 U1.6
  other v1: 9.703,-1.473 10.414,-1.473 14.072,-1.372 14.732,-1.372 9.703,-0.762 10.414,-0.762 14.072,-0.66 14.732,-0.66 9.703,-0.051 10.414,-0.051 14.072,0.051 14.732,0.051 6.625,0.686 7.408,0.686 8.191,0.686 8.975,0.686 9.703,0.686 10.414,0.686 14.072,0.762 14.732,0.762 14.072,1.473 14.732,1.473 6.629,1.524 7.391,1.524 8.153,1.524 8.915,1.524 9.703,1.524 10.414,1.524
CII: RF1.2 RF2.2 U1.5
GND: C1.2 C2.2 C3.1 C4.1 C5.1 C6.2 D1.2 J1.5 P1.2 P2.2 pad.MH1 pad.MH2 pad.MH3 pad.MH4 Q1.2 Q2.2 Q3.2 Q4.2 R3.1 R8.1 R10.1 R11.1 R12.1 R13.1 R14.1 R15.1 R16.1 RF2.1 SW1.2 U1.4 U2.3 U2.21 U3.9 U3.11 U3.13 U3.15 U4.3 | length 132.4
  Top Layer w0.203: U2.3 28.962,23.971 v2(28.499,24.435)
  Top Layer w0.559: v2(22.08,11.92) U3.11 ; v2(22.08,14.46) U3.13 ; v2(22.08,17) U3.15 ; v2(22.08,19.998) U4.3
  Top Layer w1.016: P1.2 4.47,3.443 5.066,4.039 v2(8.763,4.039)
  Top Layer w1.27: 0,27 pad.MH1 ; 4.597,27.559 10.643,27.559 ; 11.844,23.901 12.072,23.673 12.497,23.673
  Bottom Layer w0.559: v1(25.073,24.738) 30.682,24.738 31.14,25.197 46.253,25.197 46.406,25.349
  Bottom Layer w1.016: v2(8.763,6.807) v2(8.763,4.039) 10.084,2.718 43.713,2.718 pad.MH3
  Bottom Layer w1.27: pad.MH1@1.052,30.694 1.261,30.694 1.628,30.328 6.553,30.328 ; 6.687,31.143 6.687,31.898 P2.2 ; J1.5 44.916,31.942 45.667,31.191 pad.MH2 46.406,25.349 46.406,18.745 46.431,18.72 pad.MH3
  other v1: 27.127,5.981 27.838,5.981 28.55,5.981 29.261,5.981 9.855,6.592 10.516,6.592 14.122,7.024 14.783,7.024 9.855,7.304 10.516,7.304 14.122,7.735 14.783,7.735 9.855,8.015 10.516,8.015 41.757,17.45 42.469,17.45 43.18,17.45 43.891,17.45 44.602,17.45 45.313,17.45 46.025,17.45 46.736,17.45 47.447,17.45 41.757,18.313 42.469,18.313 43.18,18.313 43.891,18.313 44.602,18.313 45.313,18.313 46.025,18.313 46.736,18.313 47.447,18.313 41.757,21.107 42.469,21.107 43.18,21.107 43.891,21.107 44.602,21.107 45.313,21.107 46.025,21.107 46.736,21.107 47.447,21.107 41.757,21.971 42.469,21.971 43.18,21.971 43.891,21.971 44.602,21.971 45.313,21.971 46.025,21.971 46.736,21.971 47.447,21.971
  other v2: 18.796,9.347 19.617,9.347 20.438,9.347 21.259,9.347 22.08,9.347 29.464,23.597 28.499,23.617
GND1: R10.2 U3.2 | length 0.1
  Top Layer w1.016: R10.2 R10.2@14.741,17.01
GND2: R11.2 U3.4 | length 0
  Top Layer w1.016: R11.2 R11.2@14.69,14.453
GND3: R12.2 U3.6
GND4: R13.2 U3.8
GND5: R16.2 U4.2
"IPK SNS": R1.1 U1.1 U1.7 U1.8
MCU_IN1: R4.1 U2.20 U3.16 | length 22.7
  Top Layer w0.203: U2.20 28.18,26.761 28.724,27.305 30.836,27.305
  Top Layer w0.305: 30.836,27.305 32.106,27.305 32.766,26.645 v2(32.766,24.384)
  Bottom Layer w0.559: v2(24.841,19.152) 27.076,19.152 28.499,17.729 30.946,17.729 32.766,19.549 v2(32.766,24.384)
MCU_IN2: R5.1 U2.1 U3.14 | length 28.5
  Top Layer w0.203: 26.568,26.213 26.568,25.019 26.816,24.771 U2.1
  Top Layer w0.305: 26.568,26.213 26.568,27.203 27.153,27.788 32.664,27.788 33.858,26.594 v2(33.858,24.384)
  Bottom Layer w0.559: v2(24.841,16.637) 30.896,16.637 33.858,19.599 v2@33.858,24.409
MCU_IN3: R6.1 U2.5 U3.12 | length 3.2
  Bottom Layer w0.559: v2(24.841,14.097) 26.086,14.097 v2(27.483,15.494)
MCU_IN4: R7.1 U2.6 U3.10 | length 12.9
  Top Layer w0.203: v2@24.816,11.608 24.816,11.506 v2@24.841,11.481 ; v2(27.94,13.843) 27.94,14.656 28.18,14.896 U2.6
  Bottom Layer w0.559: v2(24.841,11.532) 25.629,11.532 v2(27.94,13.843)
MCU_IN5: R9.1 U2.13 U4.4 | length 14.1
  Top Layer w0.203: U2.13 30.482,23.973 31.313,23.973 v2(31.725,24.384)
  Bottom Layer w0.559: v2(24.841,20.244) 27.381,20.244 28.905,18.72 30.895,18.72 31.725,19.549 v2(31.725,24.384)
MCU_OUT1: Q1.1 R3.2 U2.7 | length 31.4
  Top Layer w0.203: U2.7 28.58,12.974 v2@28.6,12.954
  Bottom Layer w0.635: v2(9.779,5.436) 21.062,5.436 v2(28.58,12.954)
MCU_OUT2: Q2.1 R8.2 U2.8 | length 32.5
  Top Layer w0.203: U2.8 28.98,20.398 29.616,19.761 v2(30.582,19.761)
  Bottom Layer w0.559: v2(9.271,10.678) 9.271,14.91 15.392,21.031 27.991,21.031 29.261,19.761 v2(30.582,19.761)
MCU_OUT3: Q3.1 R14.2 U2.9 | length 26.9
  Top Layer w0.203: U2.9 29.38,21.166 29.896,20.65 v2(30.582,20.65)
  Bottom Layer w0.559: v2(9.271,16.205) 14.935,21.869 28.626,21.869 29.845,20.65 v2(30.582,20.65)
MCU_OUT4: Q4.1 R15.2 U2.10 | length 23.8
  Top Layer w0.203: U2.10 29.78,21.757 30.023,21.514 v2(30.582,21.514)
  Bottom Layer w0.559: v2(9.271,21.93) 10.099,22.758 29.312,22.758 v2@30.556,21.514
NetC3_2: C3.2 U1.3
NetC4_2: C4.2 C5.2 L2.2 U2.4 | length 0.9
  Top Layer w0.203: v1(26.594,23.571) U2.4
NetD1_1: D1.1 L1.1 U1.2
  other v1: 27.483,-1.27 28.194,-1.27 28.905,-1.27 29.616,-1.27 33.807,-1.194 34.671,-1.194 38.735,-1.194 39.599,-1.194 33.807,-0.483 34.671,-0.483 38.735,-0.483 39.599,-0.483 33.807,0.228 34.671,0.228 38.735,0.228 39.599,0.228 33.807,0.94 34.671,0.94 38.735,0.94 39.599,0.94
RESET: C6.1 R2.2 SW1.1 U2.19 | length 25.5
  Top Layer w0.203: U2.19 28.58,26.345 28.954,26.719 v2(28.958,26.719)
  Top Layer w0.559: R2.2 5.842,25.324 5.842,25.638 5.918,25.715 5.918,25.832 6.299,26.213 v2(9.5,26.213)
  Bottom Layer w0.559: v2(9.5,26.213) 10.006,26.719 v2@28.954,26.719
RESET#: J1.4 R2.1 | length 36.7
  Top Layer w0.559: R2.1 R2.1@7.298,25.255
  Bottom Layer w0.559: v2(9.093,25.197) 10.592,25.197 11.328,25.933 39.268,25.933 39.599,26.264 J1.4
RXD: J1.3 U2.11 | length 15.1
  Top Layer w0.203: U2.11 31.336,23.171 31.596,22.911 32.067,22.911
  Top Layer w0.305: 32.067,22.911 36.068,22.911 37.059,23.901 J1.3
S3_IO: P2.1 U4.1 | length 18.7
  Top Layer w0.889: P2.1 7.228,28.905 15.799,28.905 16.535,28.169 16.535,27.534 ; 15.805,25.089 16.599,24.295 ; U4.1 16.914,24.282
SNS1: P4.2 U3.1 | length 19.2
  Top Layer w0.635: P4.2@12.247,31.937 14.315,29.87 16.688,29.87 18.669,27.889 18.669,18.598 18.342,18.271 U3.1
SNS2: P6.2 U3.3 | length 18.8
  Top Layer w0.635: U3.3 18.373,15.731 19.482,16.84 19.482,30.24 P6.2
SNS3: P8.2 U3.5 | length 22.7
  Top Layer w0.635: U3.5 19.211,13.191 20.371,14.351 20.371,27.584 23.304,30.518 P8.2
SNS4: P10.2 U3.7 | length 29.5
  Top Layer w0.635: U3.7 20.024,10.651 21.26,11.887 21.26,26.949 23.901,29.591 26.478,29.591 P10.2
SOL1: P3.2 Q1.3
SOL2: P5.2 Q2.3
SOL3: P7.2 Q3.3
SOL4: P9.2 Q4.3
TXD: J1.2 U2.12 | length 12.1
  Top Layer w0.203: U2.12 31.699,23.571
  Top Layer w0.305: 31.699,23.571 34.061,23.571 34.519,24.028 J1.2
pads on no net: U2.2 U2.14 U2.15 U2.16 U2.17 U2.18

## Polygon pours and split planes (outlines as drawn)
GND on Bottom Layer "POLYGON_2" (hatched 45Degree grid 0.635 track 0.381, remove dead copper, pour order 1): 46.939,31.23 46.939,0.152 6.401,0.152 -0.432,0.152 -0.432,31.23
GND on Top Layer "POLYGON_2" (hatched 45Degree grid 0.635 track 0.381, remove dead copper, pour order 6): 46.939,31.23 46.939,0.152 6.401,0.152 -0.432,0.152 -0.432,31.23

## Other copper
Top Layer:
  rectangle net NetC4_2: 22.936,23.139 26.873,24.003
  rectangle net 3V3: 22.123,24.46 23.444,24.816
  rectangle net NetC4_2: 22.936,23.216 23.444,24.232
  rectangle net GND: 23.829,24.333 26.191,25.233
  rectangle net 3V3: 25.908,10.109 26.899,22.657
  rectangle net GND4: 14.072,8.941 17.755,9.804
  rectangle net GND3: 14.072,11.481 17.755,12.344
  rectangle net GND2: 14.072,14.021 17.755,14.884
  rectangle net GND1: 14.072,16.561 17.755,17.424
  rectangle net S3_IO: 15.291,20.828 17.755,27.762
  rectangle net GND: 41.224,16.84 48.006,22.555
  rectangle net NetD1_1: 27.102,-1.6 40.005,2.083
  region net 3V3: 40.114,12.581 31.171,12.581 31.171,9.423 40.114,9.423
  rectangle net MCU_IN3: 27.076,15.062 27.889,23.266
  rectangle net MCU_IN5: 22.454,20.743 25.248,21.717
  rectangle net MCU_IN5: 24.409,19.837 25.248,21.709
  rectangle net MCU_IN1: 22.454,17.831 25.248,18.796
  rectangle net MCU_IN1: 24.409,17.831 25.248,19.507
  rectangle net MCU_IN2: 22.454,15.316 25.248,16.281
  rectangle net MCU_IN2: 24.409,15.316 25.248,17.018
  rectangle net MCU_IN3: 22.454,12.776 25.248,13.741
  rectangle net MCU_IN3: 24.409,12.776 25.248,14.503
  rectangle net MCU_IN4: 24.409,10.211 25.248,11.938
  rectangle net MCU_IN4: 22.454,10.211 25.248,11.176
  rectangle net 3V3: 25.908,10.109 40.107,12.37
  rectangle net GND: 23.292,2.388 29.845,9.906
  rectangle net GND: 18.161,5.004 24.028,9.906
  rectangle net 3V3: 31.166,9.728 37.846,22.403
  rectangle net GND5: 13.919,18.872 17.729,20.625
  rectangle net RESET#: 6.68,24.765 9.931,25.679
  rectangle net MCU_OUT4: 4.648,21.473 9.652,22.383
  rectangle net MCU_OUT3: 4.648,15.748 9.652,16.658
  rectangle net MCU_OUT2: 4.648,10.221 9.652,11.131
  rectangle net GND: 4.648,16.937 10.744,18.821
  rectangle net GND: -2.007,26.24 5.232,28.296
  rectangle net RESET: -2.007,24.74 6.248,26.06
  rectangle net GND: -2.032,-2.057 5.334,2.489
  region net SOL1: 3.683,5.425 3.683,7.61 -1.926,7.61 -1.926,5.425
  region net SOL2: 3.683,10.897 3.683,13.081 -1.926,13.081 -1.926,10.897
  region net SOL3: 3.683,16.5 3.683,18.684 -1.926,18.684 -1.926,16.5
  region net SOL4: 3.683,21.844 3.683,24.028 -1.926,24.028 -1.926,21.844
  rectangle net GND: 4.648,22.652 13.487,24.536
  rectangle net GND: 4.648,11.4 10.566,13.284
  rectangle net MCU_OUT1: 4.648,5.004 10.185,5.914
  rectangle net GND: 4.648,6.147 10.77,8.306
  region net 12V: 19.812,2.083 13.523,2.083 13.523,1.016 19.812,1.016
  rectangle net 3V3: 19.964,3.734 20.98,4.775
  rectangle net GND: 10.77,5.004 18.364,8.179
  rectangle net NetD1_1: 23.292,-0.152 29.388,0.813
  rectangle net NetC3_2: 23.292,1.118 26.391,2.083
  rectangle net "IPK SNS": 16.688,-2.057 25.298,-0.432
  rectangle net "IPK SNS": 16.688,-1.981 19.787,0.711
  rectangle net CII: 17.094,2.362 19.736,4.775
  rectangle net GND: 10.185,6.147 13.487,28.194
  rectangle net 12V: 5.994,-2.057 16.078,3.302